# Altium PCB Zotino-DIOT.PCBDOC (part 5 of 11)
Units mil, origin at the board's own origin, x right, y up, seen from the top; angles counter-clockwise.
Board outline 8771.61 x 3949.04 mil, 4 copper layers (TopLayer, Internal Plane 2, Signal Layer 1, BottomLayer), stack 61.54 mil thick; 915 components, 534 nets, 3073 pads, 1180 vias.
Unrouted connection lines stored in the file: 36.
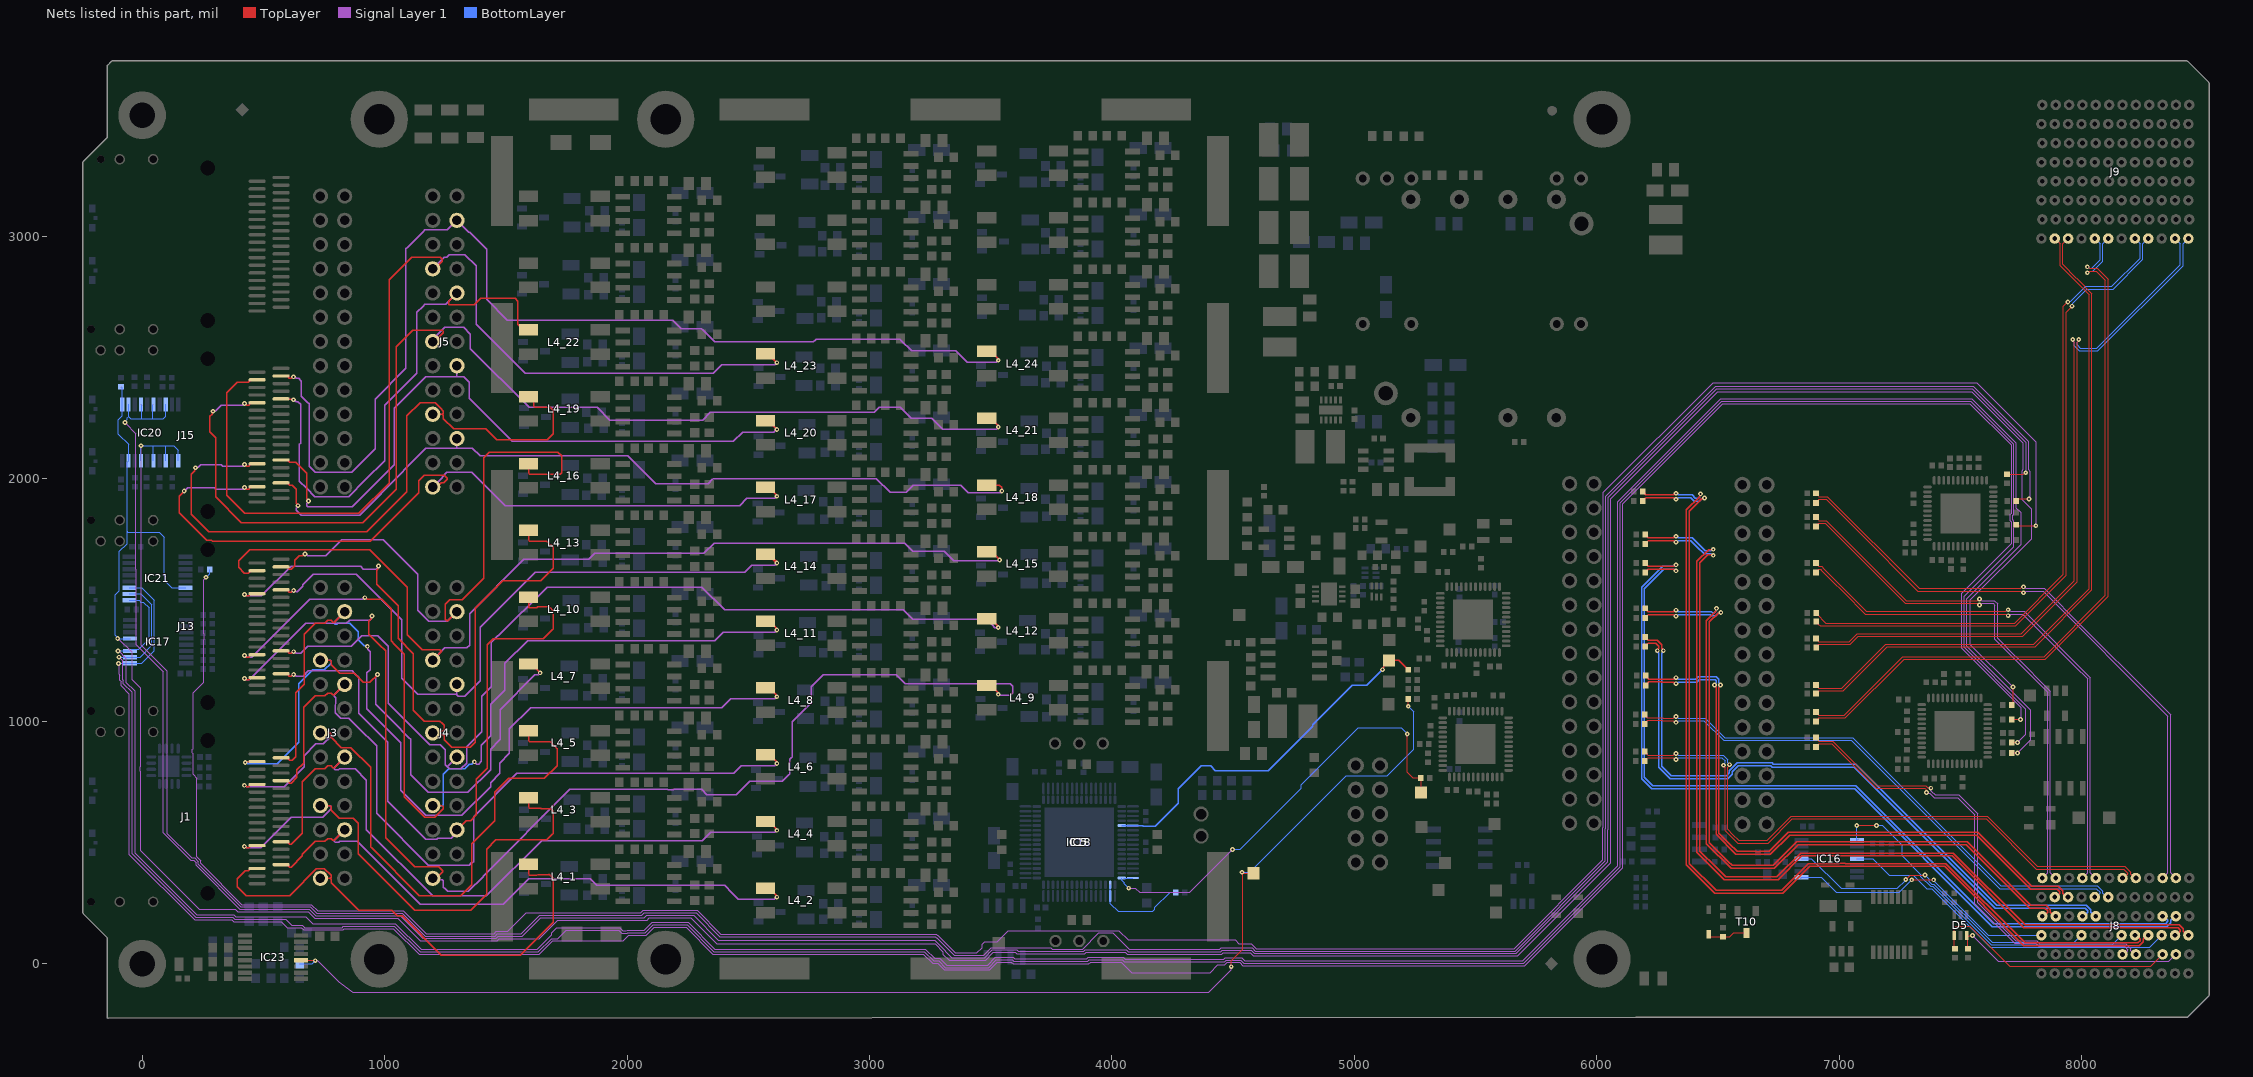
[diagram p6: the nets of this part, all layers, seen from the top]

## Via types
v1: diameter 19.68, hole 7.87, TopLayer to BottomLayer, tented both sides, 1050 vias
v2: diameter 23.62, hole 11.81, TopLayer to BottomLayer, tented both sides, 56 vias
v3: diameter 23.62, hole 11.81, TopLayer to BottomLayer, 28 vias
v4: diameter 39.37, hole 23.62, TopLayer to BottomLayer, tented both sides, 28 vias
v5: diameter 39.37, hole 19.68, TopLayer to BottomLayer, tented both sides, 7 vias
v6: diameter 19.68, hole 7.87, TopLayer to BottomLayer, tented bottom, 7 vias
v7: diameter 19.68, hole 7.87, TopLayer to BottomLayer, 4 vias

## Nets (pads, with @x,y where several pads share a name; then routed paths per layer and width w, separated by ;. In a path a pad name is that pad's centre, name@x,y a point inside that pad or via, vN(x,y) a via of type N, cw(c..) or ccw(c..) an arc to the next point about the centre after c; other vN are vias at no path point) (continued)
AFE_SPI_EN: IC17.5 IC20.1 IC20.19 IC21.6 R84.1 R125.1 | length 13784.3
  TopLayer w5: R125.1@7711.42,1066.93 7716.99,1072.5 v1(7716.99,1142.18)
  Signal Layer 1 w5: v1(-101.14,1341.54) -98.51,1341.54 -43.31,1286.34 -43.31,1173.23 -7.87,1137.8 -7.87,813.26 -10.39,810.74 -10.39,796.37 -7.87,793.85 -7.87,468.5 236.22,224.41 383.5,224.41 393.5,214.41 685.56,214.41 712.8,187.17 1053.82,187.17 1146.35,94.63 1464,94.63 1473.18,103.81 1637.03,103.81 1713.56,180.34 2082.33,180.34 2092.46,190.47 2263.11,190.47 2370.8,82.78 3270.85,82.78 3302.93,50.7 3302.93,40.41 3328.69,14.65 3479.05,14.65 3511.43,47.04 3601.53,47.04 3607.63,40.93 3887.38,40.93 3893.48,47.04 4054.6,47.04 4062.51,39.13 4452.73,39.13 4459.14,45.53 4570.01,45.53 4582.95,32.59 5673.12,32.59 6056.85,416.32 6056.85,550.94 6057.56,551.65 6057.56,1918.84 6499.2,2360.48 7546.48,2360.48 7758.12,2148.85 7758.12,2038.55 7752.19,2032.63 7752.19,1917.1 7791.34,1877.95 7791.34,1751.06 7539.37,1499.1 7539.37,1318.9 7716.08,1142.18 v1(7716.99,1142.18)
  BottomLayer w5: R84.1@-87.6,2381.1 -81.69,2375.2 IC20.1@-81.69,2307.09 -81.69,2260.83 -98.43,2244.09 -98.43,2185.36 -56.1,2143.04 IC20.19@-56.1,2074.8 -62.46,2068.44 -62.46,1783.46 ; IC17.5@-50.2,1341.54 -101.38,1341.54 -101.38,1344.37 -112.11,1355.1 -112.11,1521.83 -94.37,1539.57 -94.37,1700.79 -62.46,1732.7 -62.46,1783.46 ; IC21.6@179.13,1551.18 122.05,1551.18 94.49,1578.74 94.49,1598.43 93.18,1599.74 93.18,1600.48 91.22,1602.43 91.22,1759.17 70.87,1779.53 -58.52,1779.53 -62.46,1783.46
AFE_SPI_MISO: R91.2 R107.1 | length 11520.7
  TopLayer w5: R107.1@7731.1,1811.02 7735.04,1807.09 v1(7811.02,1807.09)
  Signal Layer 1 w5: v1(263.78,1594.61) 263.78,1593.71 251.97,1581.9 251.97,1363.52 254.8,1360.69 254.8,1337.21 251.97,1334.38 251.97,1160.11 209.97,1118.11 209.97,888.04 207.07,885.14 207.07,870.77 209.97,867.86 209.97,782.01 226,765.97 226,440.98 242.07,424.92 242.07,413.81 411.46,244.41 697.99,244.41 723.21,219.18 1077.33,219.18 1171.88,124.63 1451.58,124.63 1460.76,133.81 1508.26,133.81 1584.79,210.34 2056.8,210.34 2066.93,220.47 2288.64,220.47 2387.06,122.05 3274.49,122.05 3279.7,116.83 3282.04,116.83 3354.22,44.65 3442.88,44.65 3464.7,66.48 3464.7,81.52 3474.86,91.68 3527.79,91.68 3573.06,136.96 3825.66,136.96 3825.81,137.11 4028.24,137.11 4066.93,98.43 4507.87,98.43 4523.71,82.59 4575.38,82.59 4595.38,62.59 5658.68,62.59 6025.43,429.34 6025.43,561.95 6027.56,564.07 6027.56,1944.88 6480.32,2397.64 7566.93,2397.64 7811.02,2153.54 v1(7811.02,1807.09)
  BottomLayer w5: v1(263.78,1594.61) 263.91,1594.61 278.35,1609.06 R91.2@278.35,1625.98
AFE_SPI_MOSI: IC20.11 IC20.13 IC20.15 IC20.17 R104.1 | length 12322.2
  TopLayer w5: R104.1@7731.1,1909.45 7738.98,1917.32 v1(7783.46,1917.32)
  Signal Layer 1 w5: v1(-4.92,2136.81) -4.92,1467.97 -5.08,1467.81 -5.08,1452.99 -4.92,1452.84 -4.92,1315.94 102.36,1208.66 102.36,539.37 204.94,436.79 216.05,436.79 232.07,420.77 232.07,409.67 407.32,234.41 693.84,234.41 719.07,209.18 1073.19,209.18 1167.74,114.63 1455.72,114.63 1464.9,123.81 1563.16,123.81 1639.69,200.34 2060.94,200.34 2071.07,210.47 2284.5,210.47 2382.92,112.05 3270.35,112.05 3275.56,106.83 3277.9,106.83 3350.08,34.65 3470.76,34.65 3503.14,67.04 3747.67,67.04 3753.77,60.93 3879.09,60.93 3945.27,127.11 4002.81,127.11 4070.79,59.13 4444.45,59.13 4450.85,65.53 4578.29,65.53 4591.23,52.59 5662.82,52.59 6035.43,425.2 6035.43,557.8 6037.56,559.93 6037.56,1929.13 6490.33,2381.9 7553.35,2381.9 7779.54,2155.71 7779.54,2039.97 7786.88,2032.63 7786.88,1920.74 v1(7783.46,1917.32)
  BottomLayer w5: IC20.17@-4.92,2074.8 v1(-4.92,2136.81) 46.75,2136.81 ; IC20.15@46.26,2074.8 46.26,2136.32 46.75,2136.81 ; IC20.13@97.44,2074.8 97.44,2135.83 98.43,2136.81 ; IC20.11@148.62,2074.8 148.62,2119.09 130.91,2136.81 98.43,2136.81 ; 46.75,2136.81 98.43,2136.81
AFE_SPI_SCLK: IC20.2 IC20.4 IC20.6 IC20.8 R100.1 | length 12324.9
  TopLayer w5: R100.1@7692.91,2018.5 7758.62,2018.5 7765.56,2025.44 v1(7769.54,2025.44)
  Signal Layer 1 w5: v1(-70.87,2232.28) -25.81,2187.22 -25.81,1626.61 -27.56,1624.86 -27.56,1318.9 86.61,1204.72 86.61,540.98 200.8,426.79 211.91,426.79 222.07,416.63 222.07,405.52 403.18,224.41 689.7,224.41 714.93,199.18 1063.5,199.18 1158.05,104.63 1459.86,104.63 1469.04,113.81 1567.31,113.81 1643.83,190.34 2070.63,190.34 2080.76,200.47 2274.81,200.47 2377.16,98.13 3269.64,98.13 3312.93,54.84 3312.93,52.11 3340.39,24.65 3474.9,24.65 3507.29,57.04 3607.68,57.04 3613.78,50.93 3883.23,50.93 3889.34,57.04 4058.74,57.04 4066.65,49.13 4448.59,49.13 4454.99,55.53 4574.15,55.53 4587.09,42.59 5666.97,42.59 6045.43,421.05 6045.43,553.66 6047.56,555.79 6047.56,1924.99 6494.47,2371.9 7549.21,2371.9 7769.54,2151.57 v1(7769.54,2025.44)
  BottomLayer w5: v1(-70.87,2232.28) -70.87,2236.26 -60.99,2246.14 -60.99,2252.01 -56.1,2256.89 ; IC20.2@-56.1,2307.09 -56.1,2256.89 ; IC20.4@-4.92,2307.09 -1.97,2304.13 -1.97,2248.03 ; IC20.6@46.26,2307.09 43.31,2304.13 43.31,2248.03 ; IC20.8@97.44,2307.09 97.44,2258.86 86.61,2248.03 43.31,2248.03 ; -56.1,2256.89 -47.24,2248.03 -1.97,2248.03 ; -1.97,2248.03 43.31,2248.03
AFE_SPI_SEL0: IC17.1 IC21.11 R128.1 | length 12695.4
  TopLayer w5: R128.1@7711.42,1007.87 v1(7748.03,1007.87)
  Signal Layer 1 w5: v1(-97.44,1239.17) -97.44,1195.85 -91.67,1190.08 -91.67,1169.33 -87.17,1164.82 -87.17,1150.33 -87.26,1150.23 -87.26,1146.32 -55.12,1114.17 -55.12,452.76 216.54,181.1 370.23,181.1 376.93,174.41 573.62,174.41 598.52,149.52 655.6,149.52 665.6,139.52 828.49,139.52 833.79,144.82 1036.28,144.82 1141.97,39.13 1638.79,39.13 1693.86,94.19 1984,94.19 2007.92,118.11 2079.98,118.11 2112.34,150.47 2243.23,150.47 2353.26,40.44 3221.71,40.44 3260.12,2.03 3281.44,2.03 3308.81,-25.35 3495.61,-25.35 3528,7.04 3584.96,7.04 3592.18,-0.18 3904.79,-0.18 3912.01,7.04 4038.03,7.04 4081.33,-36.26 4404.68,-36.26 4436.14,-4.81 4465.36,-4.81 4475.7,5.53 4526.87,5.53 4539.81,-7.41 5703.06,-7.41 6106.31,395.84 6106.31,1897.65 6519.68,2311.02 7539.37,2311.02 7708.66,2141.73 7708.66,1857.17 7702.97,1851.48 7702.97,1828.83 7708.66,1823.14 7708.66,1732.28 7503.62,1527.24 7503.62,1302.74 7748.03,1058.33 v1(7748.03,1007.87)
  BottomLayer w5: v1(-97.44,1239.17) IC17.1@-50.2,1239.17 -1.97,1239.17 49.61,1290.75 49.61,1499.61 -1.97,1551.18 IC21.11@-53.15,1551.18
AFE_SPI_SEL1: IC17.2 IC21.10 R131.1 | length 12736
  TopLayer w5: R131.1@7711.42,913.39 v1(7735,913.39)
  Signal Layer 1 w5: v1(-95.47,1264.76) -80.1,1249.39 -80.1,1171.9 -77.17,1168.97 -77.17,1155.91 -43.31,1122.05 -43.31,456.69 220.47,192.91 372.57,192.91 381.07,184.41 591.18,184.41 616.07,159.52 659.75,159.52 669.75,149.52 824.35,149.52 829.65,154.82 1040.42,154.82 1146.12,49.13 1634.65,49.13 1689.71,104.19 1714.75,104.19 1749.43,138.88 1965.45,138.88 1978.67,125.66 2001.33,125.66 2003.78,128.11 2075.83,128.11 2108.2,160.47 2247.37,160.47 2357.4,50.44 3225.85,50.44 3264.27,12.03 3285.58,12.03 3312.95,-15.35 3491.47,-15.35 3523.85,17.04 3589.1,17.04 3595.2,10.93 3899.8,10.93 3905.9,17.04 4042.18,17.04 4050.08,9.13 4465.16,9.13 4471.56,15.53 4531.01,15.53 4543.96,2.59 5698.91,2.59 6096.31,399.98 6096.31,1901.79 6515.54,2321.02 7543.51,2321.02 7718.66,2145.87 7718.66,1853.03 7712.97,1847.34 7712.97,1832.97 7718.66,1827.29 7718.66,1718.66 7513.62,1513.62 7513.62,1306.88 7767.72,1052.79 7767.72,944.88 7736.22,913.39 v1(7735,913.39)
  BottomLayer w5: v1(-95.47,1264.76) IC17.2@-50.2,1264.76 -8.86,1264.76 39.61,1313.23 39.61,1480.08 -5.91,1525.59 IC21.10@-53.15,1525.59
AFE_SPI_SEL2: IC17.3 IC21.9 R135.1 | length 12776.3
  TopLayer w5: R135.1@7711.42,870.08 v1(7735,870.08)
  Signal Layer 1 w5: v1(-99.41,1290.35) -96.54,1290.35 -66.93,1260.75 -66.93,1161.42 -31.5,1125.98 -31.5,459.02 224.61,202.91 376.71,202.91 385.21,194.41 673.9,194.41 702.96,165.35 1044.78,165.35 1151.01,59.13 1629.76,59.13 1690.22,119.59 1690.22,128.72 1710.38,148.88 1969.59,148.88 1982.82,135.66 1997.18,135.66 2000.17,138.64 2071.47,138.64 2103.3,170.47 2252.26,170.47 2361.77,60.97 3229.46,60.97 3268.41,22.03 3290.47,22.03 3317.85,-5.35 3487.33,-5.35 3519.71,27.04 3593.24,27.04 3599.34,20.93 3895.66,20.93 3901.76,27.04 4046.32,27.04 4054.22,19.13 4461.02,19.13 4467.42,25.53 4535.15,25.53 4548.1,12.59 5694.77,12.59 6086.31,404.12 6086.31,1905.93 6511.4,2331.02 7547.65,2331.02 7728.66,2150.02 7728.66,1881.57 7748.03,1862.2 7748.03,1728.35 7523.62,1503.94 7523.62,1311.02 7787.4,1047.24 7787.4,921.26 7736.22,870.08 v1(7735,870.08)
  BottomLayer w5: v1(-99.41,1290.35) IC17.3@-50.2,1290.35 -43.84,1296.71 -14.29,1296.71 29.61,1340.61 29.61,1467.81 5.14,1492.28 -5.08,1492.28 -12.8,1500 IC21.9@-53.15,1500
BGA0: IC16.4 J8.C3 | length 1428.2
  BottomLayer w5: IC16.4@7073.34,433.37 7137.49,433.37 7205.85,365.02 7305.26,365.02 7361.16,309.11 7381.83,309.11 7622.45,68.49 8280.88,68.49 J8.C3@8330.03,117.65
BGA1: IC16.1 J8.F3 | length 1412.8
  TopLayer w5: v1(7072.55,570.87) v1(7153.54,570.87)
  BottomLayer w5: v1(7072.55,570.87) 7072.55,510.93 IC16.1@7073.34,510.14 IC16.1@7079.69,516.5 ; v1(7153.54,570.87) 7177.17,570.87 7259.84,488.19 7259.84,445.24 7336.99,368.1 7336.99,358.96 7376.83,319.11 7385.97,319.11 7626.59,78.49 8125.52,78.49 J8.F3@8164.67,117.65
BGA2: IC16.11 J8.I3 | length 1361.6
  TopLayer w5: v1(7274.63,347.4) 7293.37,366.14 v1(7354.33,366.14)
  BottomLayer w5: IC16.11@6844.99,433.37 6885.53,433.37 7008.05,310.85 7240.48,310.85 7274.63,345 v1(7274.63,347.4) ; v1(7354.33,366.14) 7372.42,348.05 7372.42,339.27 7382.58,329.11 7390.11,329.11 7630.74,88.49 7970.17,88.49 J8.I3@7999.32,117.65
BGA3: IC16.8 J8.L3 | length 1136.6
  TopLayer w5: v1(7299.29,346.46) v1(7389.76,346.46)
  BottomLayer w5: IC16.8@6841.19,352.8 IC16.8@6844.99,356.6 6926.86,356.6 6988.19,295.28 7248.11,295.28 v1(7299.29,346.46) ; v1@7388.34,345.03 7615.73,117.65 J8.L3@7833.97,117.65
BP_I2C.SCL: D5.3 J8.B2 R46.1 | length 976.3
  TopLayer w5: R46.1@7530.47,61.43 7530.47,111.93 D5.3@7525.94,116.46 v1(7549.88,116.46)
  Signal Layer 1 w5: v1(7549.88,116.46) 7656.59,9.75 8359.93,9.75 J8.B2@8389.08,38.91
BP_I2C.SDA: D5.1 J8.C2 R45.1 | length 1037.5
  TopLayer w5: R45.1@7477.42,62.1 7474.76,64.76 D5.1@7474.76,116.46 7474.76,147.99 7481.3,154.53 7538.02,154.53 7702.8,-10.25 8284.81,-10.25 J8.C2@8333.97,38.91
BP_IO.LVDS_N0: J8.E3 R56.1 | length 3941
  TopLayer w6: R56.1@6189.76,1909.45 6198.18,1917.87 6198.18,1919.62 6201.7,1923.13 6260.85,1923.13 6261.38,1922.6 6316.73,1922.6 6323.07,1916.26 v1(6326.77,1916.26) ; v1(6444.88,1921.26) 6442.26,1918.64 6433.29,1918.64 6381.89,1867.24 6381.89,413.39 6492.13,303.15 6762.56,303.15 6872.79,413.39 7000.51,413.39 7001.21,414.08 7025.1,414.08 7025.79,413.39 7440.2,413.39 7766.59,86.99 8232.49,86.99 8241.35,95.85 8241.35,100.82 8224.53,117.65 J8.E3@8219.79,117.65
  BottomLayer w6: v1(6326.77,1916.26) 6330.47,1916.26 6336.82,1922.6 6388.51,1922.6 6402.21,1908.91 6423.56,1908.91 6433.29,1918.64 6442.26,1918.64 v1(6444.88,1921.26)
BP_IO.LVDS_N1: J8.B3 R57.1 | length 3846.9
  TopLayer w6: R57.1@6199.61,1771.65 6208.02,1763.24 6208.02,1761.48 6211.54,1757.97 6261.68,1757.97 6262.21,1757.44 6316.73,1757.44 6323.07,1763.78 v1(6326.77,1763.78) ; v1(6480.32,1709.72) 6478.42,1707.83 6461.47,1707.83 6413.2,1659.55 6413.2,459.6 6526.53,346.27 6747.84,346.27 6846.27,444.69 7465.31,444.69 7761.7,148.3 8397.84,148.3 8406.71,139.44 8406.71,134.47 8389.89,117.65 J8.B3@8385.15,117.65
  BottomLayer w6: v1(6326.77,1763.78) 6330.47,1763.78 6336.82,1757.44 6393.39,1757.44 6421.87,1728.96 6447.45,1703.38 6470.27,1703.38 6476.61,1709.72 v1(6480.32,1709.72)
BP_IO.LVDS_N2: J8.C4 R59.1 | length 3526.6
  TopLayer w6: R59.1@6199.61,1614.17 6208.02,1622.59 6208.02,1624.34 6211.54,1627.86 6265.77,1627.86 6266.3,1627.33 6316.73,1627.33 6323.07,1620.98 v1(6326.77,1620.98)
  BottomLayer w6: v1(6326.77,1620.98) 6323.07,1620.98 6316.73,1627.33 6276.48,1627.33 6196.85,1547.7 6196.85,769.15 6231.88,734.13 6571.61,734.13 7068.83,734.13 7637.23,165.73 8346.66,165.73 8355.53,174.59 8355.53,179.56 8338.7,196.39 J8.C4@8333.97,196.39
BP_IO.LVDS_N3: J8.L4 R60.1 | length 2946.3
  TopLayer w6: R60.1@6199.61,1466.54 6208.02,1458.12 6208.02,1456.37 6211.54,1452.85 6270.74,1452.85 6271.27,1452.32 6316.73,1452.32 6323.07,1458.66 v1(6326.77,1458.66) ; v1(6494.36,1466.27) 6491.74,1463.66 6491.74,1454.69 6452.57,1415.52 6452.57,495.03 6554.08,393.51 6732.09,393.51 6830.52,491.94 7523.38,491.94 7786.09,229.23 7848.41,229.23 7859.46,218.18 7859.46,213.21 7842.64,196.39 J8.L4@7837.9,196.39
  BottomLayer w6: v1(6326.77,1458.66) 6330.47,1458.66 6336.82,1452.32 6473.48,1452.32 6477.34,1448.47 6485.52,1448.47 6491.74,1454.69 6491.74,1463.66 v1(6494.36,1466.27)
BP_IO.LVDS_N4: J8.I4 R61.1 | length 2670.6
  TopLayer w6: R61.1@6199.61,1309.06 6208.02,1317.47 6208.02,1319.23 6211.54,1322.74 6244.16,1322.74 6256.26,1310.63 6256.26,1301.84 6249.92,1295.49 v1(6249.92,1291.79)
  BottomLayer w6: v1(6249.92,1291.79) 6249.92,1288.09 6256.26,1281.75 6256.26,810.88 6302.83,764.31 6541.12,764.31 6559.32,782.51 6559.32,792.77 6583.61,817.06 6717.96,817.06 6723.99,811.02 7062.42,811.02 7644.66,228.79 8014.21,228.79 8024.82,218.18 8024.82,213.21 8008,196.39 J8.I4@8003.26,196.39
BP_IO.LVDS_N5: J8.K5 R62.1 | length 2564
  TopLayer w6: R62.1@6202.43,1147.76 6210.85,1156.18 6210.85,1159.08 6214.36,1162.6 6266.76,1162.6 6267.44,1161.93 6316.73,1161.93 6323.07,1155.58 v1(6326.77,1155.58) ; v1(6485.59,1149.61) 6485.59,1148.07 6491.94,1141.73 6491.94,534.4 6573.77,452.57 6652.71,452.57 6653.18,452.1 6677.07,452.1 6677.53,452.57 6716.35,452.57 6795.09,531.31 7566.69,531.31 7789.72,308.27 7899.29,308.27 7910.64,296.92 7910.64,291.95 7893.82,275.13 J8.K5@7889.08,275.13
  BottomLayer w6: v1(6326.77,1155.58) 6330.47,1155.58 6336.82,1161.93 6412.73,1161.93 6422.77,1171.96 6488.42,1171.96 6491.94,1168.45 6491.94,1159.65 6485.59,1153.31 v1(6485.59,1149.61)
BP_IO.LVDS_N6: J8.H5 R63.1 | length 2218.3
  TopLayer w5: R63.1@6197.92,989.54 6206.83,998.45 6206.83,1000.31 6211.23,1004.7 6267.66,1004.7 6269.59,1002.77 6316.5,1002.77 6323.34,995.93 v1(6326.77,995.93)
  BottomLayer w5: v1(6326.77,995.93) 6330.2,995.93 6337.04,1002.77 6442.11,1002.77 6522.81,922.07 7050.56,922.07 7656.21,316.43 7662.65,309.98 8060.81,309.98 8076.5,294.3 8076.5,290.15 8061.47,275.13 J8.H5@8054.44,275.13
BP_IO.LVDS_N7: J8.F6 R64.1 | length 2491.5
  TopLayer w5: R64.1@6198.22,836.33 6207.14,845.25 6207.14,847.18 6210.07,850.1 6269.19,850.1 6269.69,849.6 6316.5,849.6 6323.34,842.76 v1(6326.77,842.76) ; v1(6522.56,818.9) 6522.56,815.47 6529.4,808.63 6529.4,549.53 6547.39,531.54 6580.64,498.29 6646.94,498.29 6706.95,498.29 6806.77,598.11 7605.99,598.11 7813.12,390.98 8172.73,390.98 8190.67,373.04 8190.67,368.89 8175.64,353.87 J8.F6@8168.61,353.87
  BottomLayer w5: v1(6326.77,842.76) 6330.2,842.76 6337.04,849.6 6516.38,849.6 6529.4,836.58 6529.4,829.17 6522.56,822.33 v1(6522.56,818.9)
BP_IO.LVDS_N8: J8.C6 R146.1 | length 2512
  TopLayer w5: R146.1@6904.33,1901.57 6913.25,1910.49 6913.25,1912.83 6916.18,1915.76 6946.44,1915.76 7074.8,1787.4 7082.58,1779.62 7324.93,1537.28 7749.57,1537.28 7756.41,1530.43 v1(7759.84,1530.43)
  Signal Layer 1 w5: v1(7759.84,1530.43) 7763.27,1530.43 7770.11,1537.28 7840.68,1537.28 8356.03,1021.93 8356.03,375.93 J8.C6@8333.97,353.87
BP_IO.LVDS_N9: J8.L6 R148.1 | length 2116
  TopLayer w5: R148.1@6904.33,1803.15 6913.25,1812.07 6913.25,1814.41 6916.18,1817.33 6942.7,1817.33 7272.88,1487.16 7568.47,1487.16 7575.31,1480.31 v1(7578.74,1480.31)
  Signal Layer 1 w5: v1(7578.74,1480.31) 7582.17,1480.31 7589.01,1487.16 7635.08,1487.16 7642.54,1479.7 7642.54,1337.77 7712.69,1267.62 7859.96,1120.35 7859.96,375.93 J8.L6@7837.9,353.87
BP_IO.LVDS_N10: J8.I6 R149.1 | length 2152.8
  TopLayer w5: R149.1@6904.33,1614.17 6913.25,1623.09 6913.25,1625.43 6916.18,1628.36 6923.25,1628.36 6926.18,1625.43 6926.18,1624.38 7059.15,1491.41 7066.93,1483.63 7107.77,1442.79 7686.58,1442.79 7693.42,1435.94 v1(7696.85,1435.94)
  Signal Layer 1 w5: v1(7696.85,1435.94) 7700.28,1435.94 7707.12,1442.79 7758,1442.79 7972.44,1228.35 8025.32,1175.47 8025.32,375.93 J8.I6@8003.26,353.87
BP_IO.LVDS_N11: J9.E1 R152.1 | length 2715.6
  TopLayer w5: R152.1@6904.81,1446.59 6904.81,1445.8 6945.09,1405.51 7724.41,1405.51 7925.2,1606.3 7925.2,2712.08 v1(7943.18,2730.05)
  BottomLayer w5: v1(7943.18,2730.05) 7945.6,2732.48 7955.28,2732.48 8017.26,2794.46 8125.17,2794.46 8241.86,2911.15 8241.86,2969.6 J9.E1@8219.8,2991.66
BP_IO.LVDS_N12: J9.B1 R154.1 | length 2906.9
  TopLayer w5: R154.1@6904.81,1304.85 6913.72,1313.77 6913.72,1315.36 6916.65,1318.29 7046.44,1318.29 7079.36,1351.2 7756.52,1351.2 7762.97,1357.65 7969.12,1563.8 7978.12,1572.8 7981.35,1576.03 7981.35,2564.53 7988.19,2571.37 v1(7988.19,2574.8)
  BottomLayer w5: v1(7988.19,2574.8) 7988.19,2571.37 7981.35,2564.53 7981.35,2553.08 7995.06,2539.37 8062.37,2539.37 8407.22,2884.21 8407.22,2969.6 J9.B1@8385.16,2991.66
BP_IO.LVDS_N13: J9.K1 R155.1 | length 2805.9
  TopLayer w5: R155.1@6904.33,1149.61 6904.33,1148.82 6915.76,1137.39 7011.41,1137.39 7192.91,1318.9 7803.15,1318.9 8031.5,1547.24 8031.5,2760.03 7911.15,2880.38 7911.15,2969.6 J9.K1@7889.09,2991.66
BP_IO.LVDS_N14: J9.H1 R156.1 | length 3003
  TopLayer w5: R156.1@6904.33,1000 6913.25,1008.92 6913.25,1011.26 6916.18,1014.19 7025.8,1014.19 7267.52,1255.91 7850.2,1255.91 7856.65,1262.35 8109.43,1515.13 8109.43,2823.45 8078.64,2854.23 8074.76,2858.12 8064.64,2868.24 8033.89,2868.24 8027.05,2875.08 v1(8023.62,2875.08)
  BottomLayer w5: v1(8023.62,2875.08) 8027.05,2875.08 8033.89,2868.24 8041.31,2868.24 8076.51,2903.44 8076.51,2969.6 J9.H1@8054.45,2991.66
BP_IO.LVDS_N15: J8.F2 R158.1 | length 1899.2
  TopLayer w5: R158.1@6904.33,893.7 6913.25,902.62 6913.25,904.96 6916.18,907.89 6969.62,907.89 7153.21,724.3 7352.83,724.3 7358.07,719.06 7358.07,709.38 v1(7360.5,706.95)
  Signal Layer 1 w5: v1(7360.5,706.95) 7362.92,704.53 7372.6,704.53 7391.42,685.71 7489.32,685.71 7559.87,615.16 7559.87,247.22 7723.14,83.95 7810.88,83.95 7823.15,71.68 8177.07,71.68 8190.67,58.08 8190.67,53.93 8175.64,38.91 J8.F2@8168.61,38.91
BP_IO.LVDS_P0: J8.D3 R47.1 | length 3981.6
  TopLayer w6: R47.1@6189.76,1948.82 6198.18,1940.4 6198.18,1938.65 6201.7,1935.13 6265.82,1935.13 6266.35,1934.6 6316.73,1934.6 6323.07,1940.94 v1(6326.77,1940.94) ; v1(6427.43,1938.71) 6424.81,1936.1 6424.81,1927.13 6369.89,1872.21 6369.89,408.42 6487.16,291.15 6767.53,291.15 6877.76,401.39 7004.07,401.39 7005.76,403.08 7020.54,403.08 7022.24,401.39 7435.23,401.39 7761.62,74.99 8237.46,74.99 8253.35,90.88 8253.35,100.82 8270.17,117.65 J8.D3@8274.91,117.65
  BottomLayer w6: v1(6326.77,1940.94) 6330.47,1940.94 6336.82,1934.6 6393.49,1934.6 6407.18,1920.91 6418.59,1920.91 6424.81,1927.13 6424.81,1936.1 v1(6427.43,1938.71)
BP_IO.LVDS_P1: J8.A3 R48.1 | length 3823.8
  TopLayer w6: R48.1@6199.61,1732.28 6208.02,1740.7 6208.02,1742.45 6211.54,1745.97 6256.71,1745.97 6257.24,1745.44 6316.73,1745.44 6323.07,1739.09 v1(6326.77,1739.09) ; v1(6480.32,1685.04) 6477.91,1687.44 6458.06,1687.44 6425.2,1654.58 6425.2,464.57 6491.82,397.94 6496.06,393.7 6531.5,358.27 6742.87,358.27 6841.3,456.69 7470.28,456.69 7766.67,160.3 8402.82,160.3 8418.71,144.41 8418.71,134.47 8435.53,117.65 J8.A3@8440.27,117.65
  BottomLayer w6: v1(6326.77,1739.09) 6330.47,1739.09 6336.82,1745.44 6388.42,1745.44 6413.39,1720.47 6442.48,1691.38 6470.27,1691.38 6476.61,1685.04 v1(6480.32,1685.04)
BP_IO.LVDS_P2: J8.B4 R49.1 | length 3586.2
  TopLayer w6: R49.1@6199.61,1653.54 6208.02,1645.13 6208.02,1643.37 6211.54,1639.86 6270.74,1639.86 6271.27,1639.33 6316.73,1639.33 6323.07,1645.67 v1(6326.77,1645.67)
  BottomLayer w6: v1(6326.77,1645.67) 6323.07,1645.67 6316.73,1639.33 6271.51,1639.33 6184.85,1552.67 6184.85,764.18 6200.85,748.18 6226.91,722.13 7063.86,722.13 7632.26,153.73 8351.63,153.73 8367.53,169.62 8367.53,179.56 8384.35,196.39 J8.B4@8389.08,196.39
BP_IO.LVDS_P3: J8.K4 R50.1 | length 2946.3
  TopLayer w6: R50.1@6199.61,1427.17 6208.02,1435.58 6208.02,1437.34 6211.54,1440.85 6265.77,1440.85 6266.3,1440.32 6316.73,1440.32 6323.07,1433.98 v1(6326.77,1433.98) ; v1(6511.81,1448.82) 6509.19,1446.2 6500.22,1446.2 6464.57,1410.54 6464.57,500 6539.06,425.5 6543.31,421.26 6559.06,405.51 6727.12,405.51 6825.55,503.94 7528.35,503.94 7791.06,241.23 7853.38,241.23 7871.46,223.15 7871.46,213.21 7888.28,196.39 J8.K4@7893.02,196.39
  BottomLayer w6: v1(6326.77,1433.98) 6330.47,1433.98 6336.82,1440.32 6468.51,1440.32 6472.37,1436.47 6490.49,1436.47 6500.22,1446.2 6509.19,1446.2 v1(6511.81,1448.82)
BP_IO.LVDS_P4: J8.H4 R52.1 | length 2689.7
  TopLayer w6: R52.1@6199.61,1348.43 6208.02,1340.01 6208.02,1338.25 6211.54,1334.74 6249.13,1334.74 6268.26,1315.6 6268.26,1301.84 6274.61,1295.49 v1(6274.61,1291.79)
  BottomLayer w6: v1(6274.61,1291.79) 6274.61,1288.09 6268.26,1281.75 6268.26,815.85 6307.81,776.31 6536.15,776.31 6547.32,787.48 6547.32,796.32 6580.06,829.06 6722.93,829.06 6728.96,823.02 7067.39,823.02 7649.63,240.79 8019.18,240.79 8036.82,223.15 8036.82,213.21 8053.64,196.39 J8.H4@8058.38,196.39
BP_IO.LVDS_P5: J8.J5 R53.1 | length 2585.1
  TopLayer w6: R53.1@6201.74,1189.15 6210.16,1180.73 6210.16,1178.11 6213.67,1174.6 6271.73,1174.6 6272.41,1173.93 6316.73,1173.93 6323.07,1180.27 v1(6326.77,1180.27) ; v1(6510.28,1149.61) 6510.28,1148.07 6503.94,1141.73 6503.94,539.37 6543,500.31 6547.24,496.06 6578.74,464.57 6656.27,464.57 6657.73,463.1 6672.51,463.1 6673.98,464.57 6711.38,464.57 6790.12,543.31 7571.66,543.31 7794.69,320.27 7904.26,320.27 7922.64,301.89 7922.64,291.95 7939.46,275.13 J8.J5@7944.2,275.13
  BottomLayer w6: v1(6326.77,1180.27) 6330.47,1180.27 6336.82,1173.93 6407.76,1173.93 6417.8,1183.96 6493.39,1183.96 6503.94,1173.42 6503.94,1159.65 6510.28,1153.31 v1(6510.28,1149.61)
BP_IO.LVDS_P6: J8.G5 R54.1 | length 2235.1
  TopLayer w5: R54.1@6198.21,1028.06 6207.13,1019.15 6207.13,1017.17 6208.59,1015.7 6272.22,1015.7 6274.15,1013.77 6316.5,1013.77 6323.34,1020.61 v1(6326.77,1020.61)
  BottomLayer w5: v1(6326.77,1020.61) 6330.2,1020.61 6337.04,1013.77 6446.67,1013.77 6499.9,960.53 6503.79,956.65 6527.37,933.07 7055.12,933.07 7667.21,320.98 8065.37,320.98 8087.5,298.85 8087.5,290.15 8102.53,275.13 J8.G5@8109.56,275.13
BP_IO.LVDS_P7: J8.E6 R55.1 | length 2509.6
  TopLayer w5: R55.1@6198.37,874.94 6207.29,866.02 6207.29,864.03 6210.22,861.1 6273.74,861.1 6274.24,860.6 6316.5,860.6 6323.34,867.45 v1(6326.77,867.45) ; v1(6547.24,821.48) 6547.24,817.5 6540.4,810.66 6540.4,554.09 6559.06,535.43 6585.2,509.29 6702.39,509.29 6802.22,609.11 7610.54,609.11 7817.68,401.98 8177.29,401.98 8201.67,377.59 8201.67,368.89 8216.7,353.87 J8.E6@8223.73,353.87
  BottomLayer w5: v1(6326.77,867.45) 6330.2,867.45 6337.04,860.6 6520.94,860.6 6540.4,841.14 6540.4,829.17 6547.24,822.33 v1(6547.24,821.48)
BP_IO.LVDS_P8: J8.B6 R136.1 | length 2530.3
  TopLayer w5: R136.1@6904.33,1940.94 6913.25,1932.03 6913.25,1929.69 6916.18,1926.76 6951,1926.76 7329.49,1548.28 7749.57,1548.28 7756.41,1555.12 v1(7759.84,1555.12)
  Signal Layer 1 w5: v1(7759.84,1555.12) 7763.27,1555.12 7770.11,1548.28 7845.23,1548.28 7921.21,1472.3 7925.1,1468.41 8367.03,1026.48 8367.03,375.93 J8.B6@8389.08,353.87
BP_IO.LVDS_P9: J8.K6 R137.1 | length 2134.2
  TopLayer w5: R137.1@6904.33,1842.52 6913.25,1833.6 6913.25,1831.26 6916.18,1828.33 6947.26,1828.33 7277.43,1498.16 7568.47,1498.16 7575.31,1505 v1(7578.74,1505)
  Signal Layer 1 w5: v1(7578.74,1505) 7582.17,1505 7589.01,1498.16 7639.64,1498.16 7653.54,1484.25 7653.54,1342.33 7724.36,1271.51 7728.25,1267.62 7870.96,1124.91 7870.96,375.93 J8.K6@7893.02,353.87
BP_IO.LVDS_P10: J8.H6 R138.1 | length 2171.1
  TopLayer w5: R138.1@6904.33,1653.54 6913.25,1644.63 6913.25,1642.29 6916.18,1639.36 6927.8,1639.36 6937.18,1629.99 6937.18,1628.94 7112.33,1453.79 7686.58,1453.79 7693.42,1460.63 v1(7696.85,1460.63)
  Signal Layer 1 w5: v1(7696.85,1460.63) 7700.28,1460.63 7707.12,1453.79 7762.56,1453.79 8036.32,1180.03 8036.32,375.93 J8.H6@8058.38,353.87
BP_IO.LVDS_P11: J9.D1 R139.1 | length 2718
  TopLayer w5: R139.1@6904.81,1411.15 6904.81,1410.36 6913.72,1401.44 6914.51,1401.44 6921.44,1394.51 7728.97,1394.51 7936.2,1601.74 7936.2,2688.17 v1(7960.63,2712.6)
  BottomLayer w5: v1(7960.63,2712.6) 7963.05,2715.02 7963.05,2724.7 8021.82,2783.46 8129.73,2783.46 8252.86,2906.6 8252.86,2969.6 J9.D1@8274.92,2991.66
BP_IO.LVDS_P12: J9.A1 R140.1 | length 2925.4
  TopLayer w5: R140.1@6904.33,1342.52 6913.25,1333.6 6913.25,1332.22 6916.18,1329.29 7041.88,1329.29 7074.8,1362.2 7751.97,1362.2 7970.35,1580.58 7970.35,2564.53 7963.5,2571.37 v1(7963.5,2574.8)
  BottomLayer w5: v1(7963.5,2574.8) 7963.5,2571.37 7970.35,2564.53 7970.35,2548.52 7990.5,2528.37 8066.93,2528.37 8418.22,2879.66 8418.22,2969.6 J9.A1@8440.28,2991.66
BP_IO.LVDS_P13: J9.J1 R142.1 | length 2824.1
  TopLayer w5: R142.1@6904.33,1114.17 6904.33,1114.96 6915.76,1126.39 7015.96,1126.39 7197.47,1307.9 7807.71,1307.9 8042.5,1542.69 8042.5,2764.59 7980.27,2826.82 7976.38,2830.71 7922.15,2884.93 7922.15,2969.6 J9.J1@7944.21,2991.66
BP_IO.LVDS_P14: J9.G1 R143.1 | length 2984.8
  TopLayer w5: R143.1@6904.33,1039.37 6913.25,1030.45 6913.25,1028.11 6916.18,1025.19 7021.25,1025.19 7262.97,1266.91 7845.65,1266.91 8098.43,1519.69 8098.43,2818.9 8060.09,2857.24 8033.89,2857.24 8027.05,2850.39 v1(8023.62,2850.39)
  BottomLayer w5: v1(8023.62,2850.39) 8027.05,2850.39 8033.89,2857.24 8045.86,2857.24 8087.51,2898.88 8087.51,2969.6 J9.G1@8109.57,2991.66
BP_IO.LVDS_P15: J8.E2 R145.1 | length 1917.4
  TopLayer w5: R145.1@6904.33,933.07 6913.25,924.15 6913.25,921.81 6916.18,918.89 6974.18,918.89 7157.77,735.3 7357.39,735.3 7365.85,726.83 7375.53,726.83 v1(7377.95,724.41)
  Signal Layer 1 w5: v1(7377.95,724.41) 7380.38,721.98 7380.38,712.31 7395.98,696.71 7493.88,696.71 7570.87,619.72 7570.87,251.78 7727.7,94.95 7815.44,94.95 7827.7,82.68 8181.62,82.68 8201.67,62.63 8201.67,53.93 8216.7,38.91 J8.E2@8223.73,38.91
BRST_N: D4.2 R183.1 T10.3 | length 167.9
  TopLayer w5: D4.2@6461.5,121.43 6461.5,119.67 6468.84,112.33 R183.1@6520.65,112.33 6549.34,112.33 6564.96,127.95 T10.3@6618.11,127.95
BUSY: IC5.2 IC18.2 R51.1 | length 397.7
  BottomLayer w5: IC18.2@3993.17,326.31 IC5.2@3993.17,280.05 3993.17,248.37 4025.16,216.38 4169.16,216.38 4177.56,224.78 4177.56,232.29 4240.08,294.81 R51.1@4262.76,294.81
CLRn: IC5.64 IC18.64 R88.1 TP15.1 | length 1833.1
  TopLayer w5: v1(5218.27,948.35) 5218.27,790.87 5241.89,767.25 R88.1@5274.57,767.25 5275.35,766.46 TP15.1@5275.35,706.23
  Signal Layer 1 w5: v1(4069.57,312.13) 4096.61,312.13 4113.93,294.81 4320.63,294.81 v1(4497.8,471.98)
  BottomLayer w5: IC18.64@4040.41,353.87 4040.41,343.65 4050.57,333.49 4050.57,331.13 v1(4069.57,312.13) ; IC18.64@4048.97,353.87 IC5.64@4086.67,353.87 ; v1(4497.8,471.98) 4529.29,471.98 4781.26,723.94 4781.26,739.11 5016.08,973.93 5192.69,973.93 v1(5218.27,948.35)
CSn: IC5.53 IC18.53 R97.1 TP4.1 | length 1544
  TopLayer w6: v1(5115.83,1213.32) 5115.83,1217.02 5121.46,1222.66 5121.46,1229.5 TP4.1@5143.46,1251.5 5182.99,1251.5 R97.1@5221.5,1213
  BottomLayer w6: IC18.53@4040.41,570.4 4040.41,569.93 4126.41,569.93 4129.26,567.09 4179.58,567.09 4214.64,602.14 4214.64,603.49 4273.88,662.74 4273.88,722.85 4367.63,816.59 4406.76,816.59 4426.57,796.78 4645.43,796.78 4828.38,979.72 4828.38,985.27 4992.25,1149.14 5051.65,1149.14 v1(5115.83,1213.32)
CSN_EXT: IC23.12 R99.1 R118.2 TP18.1 | length 5600.4
  TopLayer w5: IC23.12@655.77,14.54 712.19,14.54 v1(713.84,12.89) ; v1(4492.13,-11.81) 4492.13,11.81 4539.37,59.06 v1@4539.37,375.28 ; v1(4537.17,377.49) v1@4539.37,375.28 ; TP18.1@4584.41,373.55 4541.1,373.55 v1@4539.37,375.28 ; R99.1@5221.5,1093 5221.5,1063.24 v1(5222.2,1062.53)
  Signal Layer 1 w5: v1(713.84,12.89) 723.84,12.89 810.76,-74.04 868.68,-116.8 965.34,-116.8 ccw(c978.11,19.21) 978.11,-117.4 2159.21,-117.4 ccw(c2159.21,19.21) 2171.99,-116.8 4399.85,-116.8 4492.13,-24.53 v1(4492.13,-11.81)
  BottomLayer w5: R118.2@649.37,-0.46 700.49,-0.46 v1(713.84,12.89) ; v1(4537.17,377.49) 4568.66,377.49 4966.3,775.13 5135.59,775.13 5245.83,885.36 5245.83,1038.91 v1(5222.2,1062.53)
DAC_OUT_N1: J1.A3 J3.2 L4_1.3 | length 2099.5
  TopLayer w6: J1.A3@474.17,393.24 447.74,393.24 441.74,387.24 441.74,387 438.23,383.49 424.59,383.49 391.54,350.44 391.54,317.86 428.49,280.92 609.54,280.92 666.77,338.15 666.77,341.38 718.42,393.03 751.97,393.03 779.19,365.81 779.19,356.05 775.68,352.53 ; J3.2@735.19,352.53 775.68,352.53 ; L4_1.3@1594.08,409.81 1594.08,369.32 1597.59,365.81 1628.44,365.81 1630.99,368.36 1676.36,368.36 1678.35,370.35 1694.83,353.87 1694.83,171.91 1558.81,35.89 1233.84,35.89 1071.73,198 1052.47,198 1029.58,220.89 892.6,220.89 779.19,334.29 779.19,349.02 775.68,352.53
DAC_OUT_N2: J1.B3 J3.5 L4_2.3 | length 2491.1
  TopLayer w6: J1.B3@572.99,408.98 599.43,408.98 605.43,402.99 605.43,402.75 608.94,399.24 614.26,399.24 661.07,446.04 661.07,452.65 713.45,505.03 753.75,505.03 765.01,516.29 779.92,516.29 786.95,509.26 791.92,509.26 J3.5@835.19,552.53 ; L4_2.3@2570.46,311.38 2586.62,311.38 2617.93,280.07 v1(2617.93,274.98)
  Signal Layer 1 w6: J3.5@835.19,552.53 791.92,509.26 791.92,504.29 795.44,500.78 810.61,500.78 815.52,505.69 886.16,505.69 1146.96,244.89 1488.98,244.89 1594.68,350.58 1847.49,350.58 1875.05,323.02 2402.61,323.02 2433.68,291.95 2459.41,266.22 2607.57,266.22 2616.33,274.98 v1(2617.93,274.98)
DAC_OUT_N3: J1.A6 J3.8 L4_3.3 | length 2245.2
  TopLayer w6: v1(421.26,484.32) 424.96,484.32 431.31,477.98 440.1,477.98 441.74,479.61 441.74,481.73 447.74,487.72 J1.A6@474.17,487.72 ; J3.8@735.19,652.53 775.68,652.53 779.19,649.02 779.19,634.29 813.45,600.04 856.94,600.04 857.11,600.21 870.87,600.21 890.75,580.32 890.75,453.74 1123.49,221 1354.97,221 1420.29,286.32 1420.29,473.29 1458,511 1668.88,511 1691.32,533.44 1694.83,536.95 1694.83,629.46 1691.32,632.97 1684.35,639.94 1645.94,639.94 1644.49,641.4 1597.59,641.4 1594.08,644.91 L4_3.3@1594.08,685.4
  Signal Layer 1 w6: v1(421.26,484.32) 424.96,484.32 431.31,477.98 489.79,477.98 615.84,604.03 743.96,604.03 779.19,639.26 779.19,649.02 775.68,652.53 J3.8@735.19,652.53
DAC_OUT_N4: J1.B6 J3.11 L4_4.3 | length 2955.1
  TopLayer w6: J1.B6@572.99,503.47 599.43,503.47 605.43,497.48 605.43,497.24 608.94,493.72 614.26,493.72 659.61,539.08 659.61,751.19 713.45,805.03 753.75,805.03 765.01,816.29 779.92,816.29 786.95,809.26 791.92,809.26 J3.11@835.19,852.53 ; L4_4.3@2570.45,586.97 2586.03,586.97 2617.93,555.07 v1(2617.93,550.57)
  Signal Layer 1 w6: J3.11@835.19,852.53 791.92,809.26 791.92,804.29 795.44,800.78 810.61,800.78 813.86,804.03 879.28,804.03 925.2,758.11 925.2,552.4 1197.88,279.72 1419.41,279.72 1647.58,507.89 2310.8,507.89 2344.72,541.81 2609.16,541.81 v1(2617.93,550.57)
DAC_OUT_N5: J1.A14 J3.14 L4_5.3 | length 2679.3
  TopLayer w6: v1(421.26,736.29) 424.96,736.29 431.31,729.94 440.1,729.94 441.74,731.58 441.74,733.7 447.74,739.69 J1.A14@474.17,739.69 ; J3.14@735.19,952.53 775.68,952.53 779.19,949.02 779.19,934.29 821.46,892.03 860.97,892.03 942.91,810.09 942.91,481.4 946.43,477.89 1143.32,281 1314.97,281 1360,326.03 1360,495.6 1454.49,590.09 1454.49,707.49 1512.13,765.13 1659.42,765.13 1712,817.71 1712,887.88 1682.89,916.99 1597.59,916.99 1594.08,920.5 L4_5.3@1594.08,960.99
  Signal Layer 1 w6: v1(421.26,736.29) 424.96,736.29 431.31,729.94 586.51,729.94 668.39,811.83 668.39,858.56 716.7,906.87 746.79,906.87 779.19,939.26 779.19,949.02 775.68,952.53 J3.14@735.19,952.53
DAC_OUT_N6: J1.B14 J3.17 L4_6.3 | length 3333.5
  TopLayer w6: J1.B14@572.99,755.44 599.43,755.44 605.43,749.45 605.43,749.21 608.94,745.69 614.26,745.69 638.47,769.9 638.47,799.94 666.34,827.81 666.34,1057.92 713.45,1105.03 753.75,1105.03 765.01,1116.29 779.92,1116.29 786.95,1109.26 791.92,1109.26 J3.17@835.19,1152.53 ; L4_6.3@2570.46,862.56 2588.44,862.56 2617.93,833.07 v1(2617.93,826.16) v1@2613,831.09
  Signal Layer 1 w6: J3.17@835.19,1152.53 791.92,1109.26 791.92,1104.29 798.95,1097.26 798.95,1072.15 795.7,1068.89 795.7,1036.18 818.83,1013.04 852.36,1013.04 887.42,977.97 966.54,898.86 966.54,620.82 1180.12,407.23 1348.73,407.23 1357.39,415.89 1361.84,415.89 1366.84,420.89 1366.84,607.15 1546.06,786.37 2440.35,786.37 2471.38,817.4 2609.16,817.4 v1(2617.93,826.16)
DAC_OUT_N7: J1.A17 J3.20 L4_7.3 | length 2512.1
  TopLayer w6: v1(425.2,830.78) 427.11,832.69 472.69,832.69 J1.A17@474.17,834.18 ; J3.20@735.19,1252.53 775.68,1252.53 779.19,1249.02 779.19,1234.29 815.17,1198.32 874.92,1198.32 912.35,1160.89 939.64,1160.89 970.68,1191.93 v1(970.68,1192.89) ; L4_7.3@1581.29,1236.58 L4_7.3@1594.08,1236.58 1606.42,1236.58 1641.55,1201.45 v1(1641.55,1200.18)
  Signal Layer 1 w6: v1(970.68,1192.89) 963.84,1186.05 963.84,1069.99 1035.64,998.19 1100.44,933.38 1107.47,926.35 1107.47,779.55 1179.13,707.89 1343.84,707.89 1436.84,800.89 1436.84,885.75 1473.23,922.14 1476.74,925.65 1476.74,1048.13 1620.03,1191.42 1632.78,1191.42 v1(1641.55,1200.18)
  BottomLayer w6: v1(425.2,830.78) 428.9,830.78 435.24,824.43 459.02,824.43 556.72,824.43 645.48,913.2 645.48,1154.39 703.13,1212.04 751.97,1212.04 779.19,1239.26 779.19,1249.02 775.68,1252.53 J3.20@735.19,1252.53
DAC_OUT_N8: J1.B17 J3.23 L4_8.3 | length 3683.2
  TopLayer w6: J1.B17@572.99,849.93 599.43,849.93 605.43,843.93 605.43,843.7 608.94,840.18 619.71,840.18 632.87,853.35 632.87,1118.35 668.31,1153.78 668.31,1359.89 713.45,1405.03 753.75,1405.03 765.01,1416.29 779.92,1416.29 786.95,1409.26 791.92,1409.26 J3.23@835.19,1452.53 ; L4_8.3@2570.45,1138.15 2587.85,1138.15 2617.93,1108.07 v1(2617.93,1101.76)
  Signal Layer 1 w6: v1(928.6,1309.5) 931.08,1307.02 931.08,1297.34 940.6,1287.82 940.6,1213.72 927.15,1200.28 927.15,1051.24 1066.93,911.46 1066.93,716.54 1079.72,703.74 1170.43,613.04 1318.99,613.04 1436.84,730.89 1436.84,747.15 1474.84,785.15 1474.84,827.81 1514.74,867.71 1514.74,968.99 1602.13,1056.37 2390.35,1056.37 2426.97,1092.99 2609.16,1092.99 v1(2617.93,1101.76)
  BottomLayer w6: J3.23@835.19,1452.53 791.92,1409.26 791.92,1404.29 795.44,1400.78 803.02,1400.78 806.28,1404.03 856.52,1404.03 891.62,1368.93 891.62,1336.8 916.43,1311.99 926.11,1311.99 v1(928.6,1309.5)
DAC_OUT_N9: J4.2 J13.A3 L4_9.3 | length 5155.2
  TopLayer w6: v1(422.17,1177.23) 425.87,1177.23 432.21,1170.89 441.01,1170.89 441.74,1171.62 441.74,1174.64 447.74,1180.64 J13.A3@474.17,1180.64 ; v1(947.83,1435.04) 945.22,1432.42 945.22,1423.45 935.48,1413.72 935.48,1359.79 978.35,1316.93 1003.84,1291.44 1003.84,520.92 1105.35,419.4 1123.72,401.04 1222.49,401.04 1239.8,383.72 1239.8,378.75 1213.58,352.53 J4.2@1198.29,352.53 ; L4_9.3@3483.84,1147.99 3501.01,1147.99 3531.31,1117.69 v1(3531.31,1111.6)
  Signal Layer 1 w6: v1(422.17,1177.23) 425.87,1177.23 432.21,1170.89 441.56,1170.89 674.7,1404.03 842.55,1404.03 855.74,1417.23 939,1417.23 945.22,1423.45 945.22,1432.42 v1(947.83,1435.04) ; J4.2@1198.29,352.53 1204.31,346.51 1238.77,346.51 1242.28,343 1242.28,316.77 1249.31,309.74 1259.84,299.21 1345.03,299.21 1405.84,360.03 1405.84,361.44 1763.46,719.06 2167.32,719.06 2167.64,718.75 2192.36,718.75 2192.68,719.06 2309.06,719.06 2329.76,698.35 2451.28,698.35 2505.81,752.89 2640.81,752.89 2667.32,779.4 2670.84,782.92 2670.84,842.92 2677.32,849.4 2680.84,852.92 2680.84,997.92 2760,1077.08 2760,1143 2810,1193 3110,1193 3148.05,1154.95 3580,1154.95 3590.31,1144.63 3590.31,1118.22 3579.93,1107.83 3535.08,1107.83 v1(3531.31,1111.6)
DAC_OUT_N10: J4.5 J13.B3 L4_10.3 | length 2636.1
  TopLayer w6: J13.B3@572.99,1196.39 599.43,1196.39 605.43,1190.39 605.43,1187.37 606.16,1186.64 614.95,1186.64 621.3,1192.98 v1(625,1192.98) ; J4.5@1298.29,552.53 1336.75,591 1354.97,591 1374.29,610.32 1377.8,613.83 1377.8,760.8 1422.84,805.84 1422.84,1315.84 1448,1341 1654.97,1341 1691.32,1377.35 1694.83,1380.86 1694.83,1456.23 1691.32,1459.74 1678.81,1472.25 1632.49,1472.25 1628.4,1468.17 1597.59,1468.17 1594.08,1471.68 L4_10.3@1594.08,1512.17
  Signal Layer 1 w6: v1(625,1192.98) 628.7,1192.98 635.05,1186.64 663.76,1186.64 685.41,1208.29 866.75,1208.29 875.61,1199.43 893.89,1181.15 893.89,1032.97 1012,914.86 1012,671.07 1071.85,611.22 1170.03,513.04 1214.64,513.04 1219.5,517.89 1273.84,517.89 1298.28,542.33 J4.5@1298.29,552.53
DAC_OUT_N11: J4.8 J13.A6 L4_11.3 | length 3900.1
  TopLayer w6: v1(422.17,1271.72) 425.87,1271.72 432.21,1265.38 441.01,1265.38 441.74,1266.11 441.74,1269.13 447.74,1275.13 J13.A6@474.17,1275.13 ; v1(918.31,1510.37) 922.01,1510.37 928.35,1504.03 987.35,1504.03 995.69,1495.69 1026.57,1464.81 1026.57,1331.93 1041.95,1316.56 1080.71,1277.8 1080.71,688.98 1129.92,639.76 1165.65,604.03 1207.05,604.03 1242.29,639.26 1242.29,649.02 1238.77,652.53 J4.8@1198.29,652.53 ; L4_11.3@2570.45,1413.74 2581.53,1413.74 2599.27,1396 2605,1396 2617.93,1383.07 v1(2617.93,1377.35)
  Signal Layer 1 w6: v1(422.17,1271.72) 425.87,1271.72 432.21,1265.38 452.39,1265.38 691.04,1504.03 908.26,1504.03 914.6,1510.37 v1(918.31,1510.37) ; v1(1370,833) 1371.36,833 1380.36,824 1387.65,824 1398.84,835.19 1398.84,901.49 1435.23,937.88 1438.74,941.39 1438.74,1070.11 1496.51,1127.88 1496.51,1239.51 1589.89,1332.89 2361.87,1332.89 2397.56,1368.58 2609.16,1368.58 v1(2617.93,1377.35)
  BottomLayer w6: J4.8@1198.29,652.53 1238.77,652.53 1242.29,656.05 1242.29,782.62 1263.7,804.03 1331.66,804.03 1335.55,807.92 1335.55,808.63 1349.7,822.78 1358.43,822.78 1368.64,833 v1(1370,833)
DAC_OUT_N12: J4.11 J13.B6 L4_12.3 | length 4132.6
  TopLayer w6: J13.B6@572.99,1290.87 599.43,1290.87 605.43,1284.88 605.43,1281.86 606.16,1281.13 614.95,1281.13 621.3,1287.47 v1(625,1287.47) ; L4_12.3@3483.84,1423.58 3499.42,1423.58 3527.5,1395.5 3527.5,1391 v1(3531.31,1387.19)
  Signal Layer 1 w6: v1(625,1287.47) 628.7,1287.47 635.05,1281.13 654.9,1281.13 683.82,1310.04 862.95,1310.04 905.46,1352.55 972.49,1352.55 1015.84,1309.2 1015.84,1074.68 1186.49,904.03 1229.63,904.03 1249.83,883.83 1249.83,822.02 1258.8,813.05 ; J4.11@1298.29,852.53 1258.8,813.05 ; v1(3531.31,1387.19) 3516.51,1387.19 3506.1,1397.6 3485.81,1417.89 3482.3,1421.4 3178.57,1421.4 3140.08,1459.89 2402.84,1459.89 2308.73,1554 1669.95,1554 1468.79,1352.84 1467.64,1352.84 1440.84,1326.04 1440.84,1142.92 1400.74,1102.82 1400.74,957.13 1337.98,894.37 1337.98,827.03 1314.98,804.03 1267.82,804.03 1258.8,813.05
DAC_OUT_N13: J4.14 J13.A14 L4_13.3 | length 2964.4
  TopLayer w6: v1(422.17,1523.69) 425.87,1523.69 432.21,1517.35 441.01,1517.35 441.74,1518.08 441.74,1521.1 447.74,1527.09 J13.A14@474.17,1527.09 ; v1(974.41,1641.42) 972.69,1639.69 972.69,1628.49 966.56,1622.36 966.56,1565.69 1000.37,1531.87 1055.84,1476.4 1055.84,1342.15 1118.84,1279.15 1118.84,1045.92 1163.87,1000.89 1227.79,1000.89 1237.22,991.47 1245.66,983.02 1245.66,965.29 1238.78,958.41 1204.16,958.41 J4.14@1198.29,952.53 1206.64,944.18 1242.15,944.18 1245.66,940.67 1245.66,923.93 1256.56,913.04 1276.66,892.93 1353.51,892.93 1374.29,913.71 1374.29,1467.29 1488,1581 1644.07,1581 1694.83,1631.76 1694.83,1717.57 1668.65,1743.76 1597.59,1743.76 1594.08,1747.27 L4_13.3@1594.08,1787.76
  Signal Layer 1 w6: v1(422.17,1523.69) 425.87,1523.69 432.21,1517.35 491.76,1517.35 614.26,1639.85 901.49,1639.85 912.85,1628.49 965.66,1628.49 969.17,1632.01 969.17,1632.48 974.41,1637.71 v1(974.41,1641.42)
DAC_OUT_N14: J4.17 J13.B14 L4_14.3 | length 2951
  TopLayer w6: J13.B14@572.99,1542.84 599.43,1542.84 605.43,1536.85 605.43,1533.83 606.16,1533.09 614.95,1533.09 621.3,1539.44 v1(625,1539.44) ; L4_14.3@2570.45,1689.33 L4_14.3@2581.53,1689.33 ; L4_14.3@2581.53,1689.33 2586.67,1689.33 2617.93,1658.07 v1(2617.93,1652.94) L4_14.3@2581.53,1689.33
  Signal Layer 1 w6: v1(625,1539.44) 627.62,1536.82 634,1536.82 635.36,1535.47 640.33,1535.47 661.38,1556.52 661.38,1564.18 704.68,1607.47 882.13,1607.47 1070.84,1418.76 1070.84,1177.89 1135.84,1112.89 1298.29,1112.89 J4.17@1298.29,1152.53 ; 1298.29,1110.46 1304.72,1104.03 1329.98,1104.03 1394.35,1168.4 1394.35,1388.6 1620.64,1614.89 2484.59,1614.89 2513.87,1644.17 2609.16,1644.17 v1(2617.93,1652.94)
DAC_OUT_N15: J4.20 J13.A17 L4_15.3 | length 4024.6
  TopLayer w6: J13.A17@474.17,1621.58 447.74,1621.58 441.74,1615.59 441.74,1615.35 438.23,1611.83 421.63,1611.83 398.62,1634.84 398.62,1663.39 443.39,1708.16 939.67,1708.16 1093.84,1553.99 1093.84,1357.89 1155.84,1295.89 1228.11,1295.89 1234.66,1289.34 1234.66,1288.91 J4.20@1198.29,1252.53 ; L4_15.3@3483.84,1699.17 3503.83,1699.17 v1(3537,1666)
  Signal Layer 1 w6: J4.20@1198.29,1252.53 1248.64,1302.89 1338.84,1302.89 1350.16,1314.21 1350.16,1334.2 1351.84,1335.89 1351.84,1444.84 1574.89,1667.89 1841.87,1667.89 1866.87,1692.89 2316.87,1692.89 2358.87,1734.89 3145,1734.89 3177.84,1702.06 3307.91,1702.06 3346.97,1663 3534,1663 v1(3537,1666)
DAC_OUT_N16: J4.23 J13.B17 L4_16.3 | length 2459.4
  TopLayer w6: J13.B17@572.99,1637.33 599.43,1637.33 605.43,1631.34 605.43,1631.1 608.94,1627.58 614.26,1627.58 628.56,1641.88 628.56,1663.76 648.43,1683.63 661.61,1683.63 668.3,1690.31 v1(671.97,1690.31) ; J4.23@1298.29,1452.53 1260.7,1414.95 1255.73,1414.95 1250,1420.68 1250,1483 1268.04,1501.04 1319.62,1501.04 1408.29,1589.71 1408.29,2088.03 1431.26,2111 1715.03,2111 1730,2096.03 1730,2024.78 1724.57,2019.35 1597.59,2019.35 1594.08,2022.86 L4_16.3@1594.08,2063.35
  Signal Layer 1 w6: v1(671.97,1690.31) 675.67,1690.31 681.95,1684.04 757.86,1684.04 823.82,1750 993.7,1750 1135.84,1607.86 1135.84,1459.12 1181.93,1413.04 1258.79,1413.04 J4.23@1298.29,1452.53
DAC_OUT_N17: J5.2 J15.A3 L4_17.3 | length 3380.9
  TopLayer w6: v1(173.06,1950.53) 173.06,1949.99 152.28,1929.2 152.28,1861.26 266.83,1746.71 286.19,1746.71 289.32,1743.57 941.46,1743.57 1139.95,1942.07 1139.95,1992.03 1163.13,2015.21 1246.52,2015.21 1258.84,2002.89 1258.84,1997.89 1244.74,1983.79 1234.02,1983.79 1216.94,1966.71 J5.2@1198.29,1966.71 ; v1(422.17,1964.63) 425.87,1964.63 432.21,1958.29 441.01,1958.29 441.74,1959.02 441.74,1962.04 447.74,1968.04 J15.A3@474.17,1968.04 ; L4_17.3@2570.45,1964.92 2585.08,1964.92 2617.93,1932.07 v1(2617.93,1928.53)
  Signal Layer 1 w6: v1(173.06,1950.53) 175,1950.53 187.36,1962.88 299.07,1962.88 303.66,1958.29 412.12,1958.29 418.46,1964.63 v1(422.17,1964.63) ; J5.2@1198.29,1966.71 1237.15,2005.58 1237.15,2007.21 1257.15,2027.21 1359.52,2027.21 1496.84,1889.89 2464,1889.89 2493.87,1919.76 2609.16,1919.76 v1(2617.93,1928.53)
DAC_OUT_N18: J5.5 J15.B3 L4_18.3 | length 3439.2
  TopLayer w6: J15.B3@572.99,1983.79 599.43,1983.79 605.43,1977.79 605.43,1977.55 608.94,1974.04 619.23,1974.04 636.45,1956.82 636.45,1899.81 642.8,1893.47 v1(642.8,1889.76) ; L4_18.3@3483.84,1974.77 3536.23,1974.77 3546,1965 v1(3546,1950)
  Signal Layer 1 w6: v1(642.8,1889.76) 642.8,1886.06 636.45,1879.72 636.45,1870.92 656.16,1851.21 896.92,1851.21 985.39,1939.69 985.39,1941.1 1170.7,2126.4 1204.55,2126.4 1298.29,2126.4 1362.31,2126.4 1393.59,2095.12 2002.84,2095.12 2117.62,1980.35 2334.33,1980.35 2351.87,1997.89 2355.38,2001.4 3028,2001.4 3085.11,1944.29 3151.29,1944.29 3180,1973 3376.97,1973 3406.97,1943 3539,1943 v1(3546,1950) ; 1298.29,2127.21 J5.5@1298.29,2166.71
DAC_OUT_N19: J5.8 J15.A6 L4_19.3 | length 2766
  TopLayer w6: v1(219.75,2046) 217.13,2043.38 217.13,2034.41 202.58,2019.86 202.58,1854.07 275.08,1781.57 925.72,1781.57 1090.84,1946.7 1090.84,2259.89 1146.16,2315.21 1198.05,2315.21 1207.05,2315.21 1208.81,2313.46 1230.83,2291.43 1242.29,2279.98 1242.29,2270.22 1238.77,2266.71 ; v1(422.17,2059.12) 425.87,2059.12 432.21,2052.78 441.01,2052.78 441.74,2053.51 441.74,2056.53 447.74,2062.53 J15.A6@474.17,2062.53 ; J5.8@1198.29,2266.71 1238.77,2266.71 ; L4_19.3@1594.08,2338.94 1595.48,2338.94 1616.1,2318.32 1616.1,2298.45 1619.62,2294.94 1682.89,2294.94 1686.46,2291.37 1694.83,2283 1694.83,2186.66 1670.32,2162.15 1461.92,2162.15 1417.87,2206.2 1284.55,2206.2 1242.29,2248.47 1242.29,2263.19 1238.77,2266.71
  Signal Layer 1 w6: v1(219.75,2046) 222.37,2048.62 231.34,2048.62 241.07,2058.35 326.14,2058.35 331.71,2052.78 412.12,2052.78 418.46,2059.12 v1(422.17,2059.12)
DAC_OUT_N20: J5.11 J15.B6 L4_20.3 | length 2846.8
  TopLayer w6: J15.B6@572.99,2078.28 599.43,2078.28 605.43,2072.28 605.43,2072.04 608.94,2068.53 634.47,2068.53 664.98,2038.01 679.76,2023.23 679.76,1918.51 686.1,1912.17 v1(686.1,1908.46) ; L4_20.3@2570.45,2240.51 2581.53,2240.51 v1(2617.93,2204.12)
  Signal Layer 1 w6: v1(686.1,1908.46) 686.1,1904.76 679.76,1898.42 679.76,1889.62 683.27,1886.11 867.06,1886.11 1040.35,2059.4 1040.35,2292.32 1169.95,2421.92 1300.8,2421.92 ; J5.11@1298.29,2466.71 1298.29,2424.43 1300.8,2421.92 ; v1(2617.93,2204.12) 2616.33,2204.12 2605.71,2193.5 2597.63,2193.5 2597.36,2193.23 2476.75,2193.23 2438.4,2154.89 2193.86,2154.89 2192.36,2156.39 2167.64,2156.39 2166.14,2154.89 1526.84,2154.89 1349.78,2331.95 1349.78,2345.38 1349.78,2399.51 1327.37,2421.92 1300.8,2421.92
DAC_OUT_N21: J5.14 J15.A14 L4_21.3 | length 4980.3
  TopLayer w6: v1(291.6,2279.27) 288.98,2276.65 288.98,2267.68 279.25,2257.94 279.25,2194.49 302.96,2170.78 302.96,1926.13 409.52,1819.57 909.98,1819.57 1048.42,1958.02 1048.42,2545.5 1115.81,2612.89 1238.84,2612.89 1242.28,2609.44 1242.28,2602.89 1206.1,2566.71 J5.14@1198.29,2566.71 ; v1(422.17,2311.09) 425.87,2311.09 432.21,2304.75 441.01,2304.75 441.74,2305.48 441.74,2308.5 447.74,2314.5 J15.A14@474.17,2314.5 ; L4_21.3@3483.84,2250.36 3499.64,2250.36 3531.31,2218.69 v1(3531.31,2213.96)
  Signal Layer 1 w6: v1(291.6,2279.27) 294.22,2281.88 303.19,2281.88 326.05,2304.75 412.12,2304.75 418.46,2311.09 v1(422.17,2311.09) ; J5.14@1198.29,2566.71 1198.28,2575.86 1247.31,2624.89 1326.81,2624.89 1353.84,2597.86 1353.84,2537.89 1596.84,2294.89 1876.84,2294.89 1928.84,2242.89 2311.87,2242.89 2343.87,2274.89 3019.21,2274.89 3037.32,2293 3040.84,2296.51 3126.31,2296.51 3129.83,2293 3172.94,2249.89 3256.84,2249.89 3301.53,2205.2 3522.55,2205.2 v1(3531.31,2213.96)
DAC_OUT_N22: J5.17 J15.B14 L4_22.3 | length 2225.5
  TopLayer w6: J15.B14@572.99,2330.24 599.43,2330.24 600.92,2328.76 622.77,2328.76 v1(624.69,2326.84) ; J5.17@1298.29,2766.71 1264.58,2733 1264.58,2718.42 1264.8,2718.2 1369.49,2718.2 1396.46,2745.17 1538.07,2745.17 1549.78,2733.46 1549.78,2638.08 1573.33,2614.53 L4_22.3@1594.08,2614.53
  Signal Layer 1 w6: v1(624.69,2326.84) 626.89,2326.84 635.04,2318.69 642.66,2318.69 653.2,2308.14 653.2,2148.14 648.47,2143.41 648.47,1991.29 679.13,1960.63 712.55,1927.21 817.11,1927.21 851.55,1927.21 920.76,1996.42 1000,2075.66 1000,2304.13 1007.03,2311.16 1132.87,2437.01 1132.87,2687.01 1158.73,2712.86 1165.76,2719.89 1251.47,2719.89 J5.17@1298.29,2766.71
DAC_OUT_N23: J5.20 J15.A17 L4_23.3 | length 4353.4
  TopLayer w6: J15.A17@474.17,2408.98 447.74,2408.98 441.74,2402.99 441.74,2402.75 438.23,2399.24 392.11,2399.24 348.24,2355.36 348.24,1933.02 423.68,1857.57 894.24,1857.57 1018.89,1982.23 1018.89,2821.81 1112.29,2915.21 1229.96,2915.21 1237.95,2907.22 1237.95,2898.56 1206.1,2866.71 J5.20@1198.29,2866.71 ; L4_23.3@2570.45,2516.1 2581.53,2516.1 v1(2617.93,2479.71)
  Signal Layer 1 w6: J5.20@1198.29,2866.71 1246.47,2914.89 1257.13,2914.89 1267.17,2924.92 1331.51,2924.92 1377.91,2878.52 1377.91,2638.82 1580.35,2436.37 2355.43,2436.37 2390,2470.94 2609.16,2470.94 v1(2617.93,2479.71)
DAC_OUT_N24: J5.23 J15.B17 L4_24.3 | length 4599.3
  TopLayer w6: J15.B17@572.99,2424.73 599.43,2424.73 605.43,2418.74 605.43,2415.72 606.16,2414.98 614.95,2414.98 621.3,2421.33 v1(624.69,2421.33) ; L4_24.3@3483.84,2525.95 3501.05,2525.95 3531.31,2495.69 v1(3531.31,2489.55)
  Signal Layer 1 w6: v1(624.69,2421.33) 628.39,2421.33 634.98,2414.73 644.98,2414.73 656.86,2402.86 656.86,2340.71 681.15,2316.41 688.18,2309.38 688.18,2052.61 713.58,2027.21 734.98,2027.21 ccw(c735.19,2066.71) 735.19,2027.21 835.19,2027.21 ccw(c835.19,2066.71) 835.41,2027.21 861.34,2027.21 ccw(c861.34,2033.21) 865.6,2028.99 960.64,2124.02 960.64,2329.73 1087.6,2456.69 1087.6,2948.82 1094.63,2955.85 1158.96,3020.18 1165.99,3027.21 1186.44,3027.21 1198.28,3027.21 1258.79,3027.21 J5.23@1298.29,3066.71 1346.79,3018.2 1350.49,3018.2 1357.32,3011.37 1398.84,2969.86 1420.29,2948.41 1420.29,2741.44 1506.84,2654.89 2188.11,2654.89 2191.63,2651.37 2223.08,2619.92 2306.81,2619.92 2311.84,2614.89 2361.84,2564.89 2768.62,2564.89 2776.73,2573 2780.24,2576.51 3126.49,2576.51 3130,2573 3175.11,2527.89 3356.74,2527.89 3403.84,2480.79 3522.55,2480.79 v1(3531.31,2489.55)